# Altium PCB Yalynka.PcbDoc
Units mil, origin at the board's own origin, x right, y up, seen from the top; angles counter-clockwise.
Board outline 2470 x 1740 mil, 2 copper layers (Top Layer, Bottom Layer); 10 components, 8 nets, 22 pads, 2 vias.
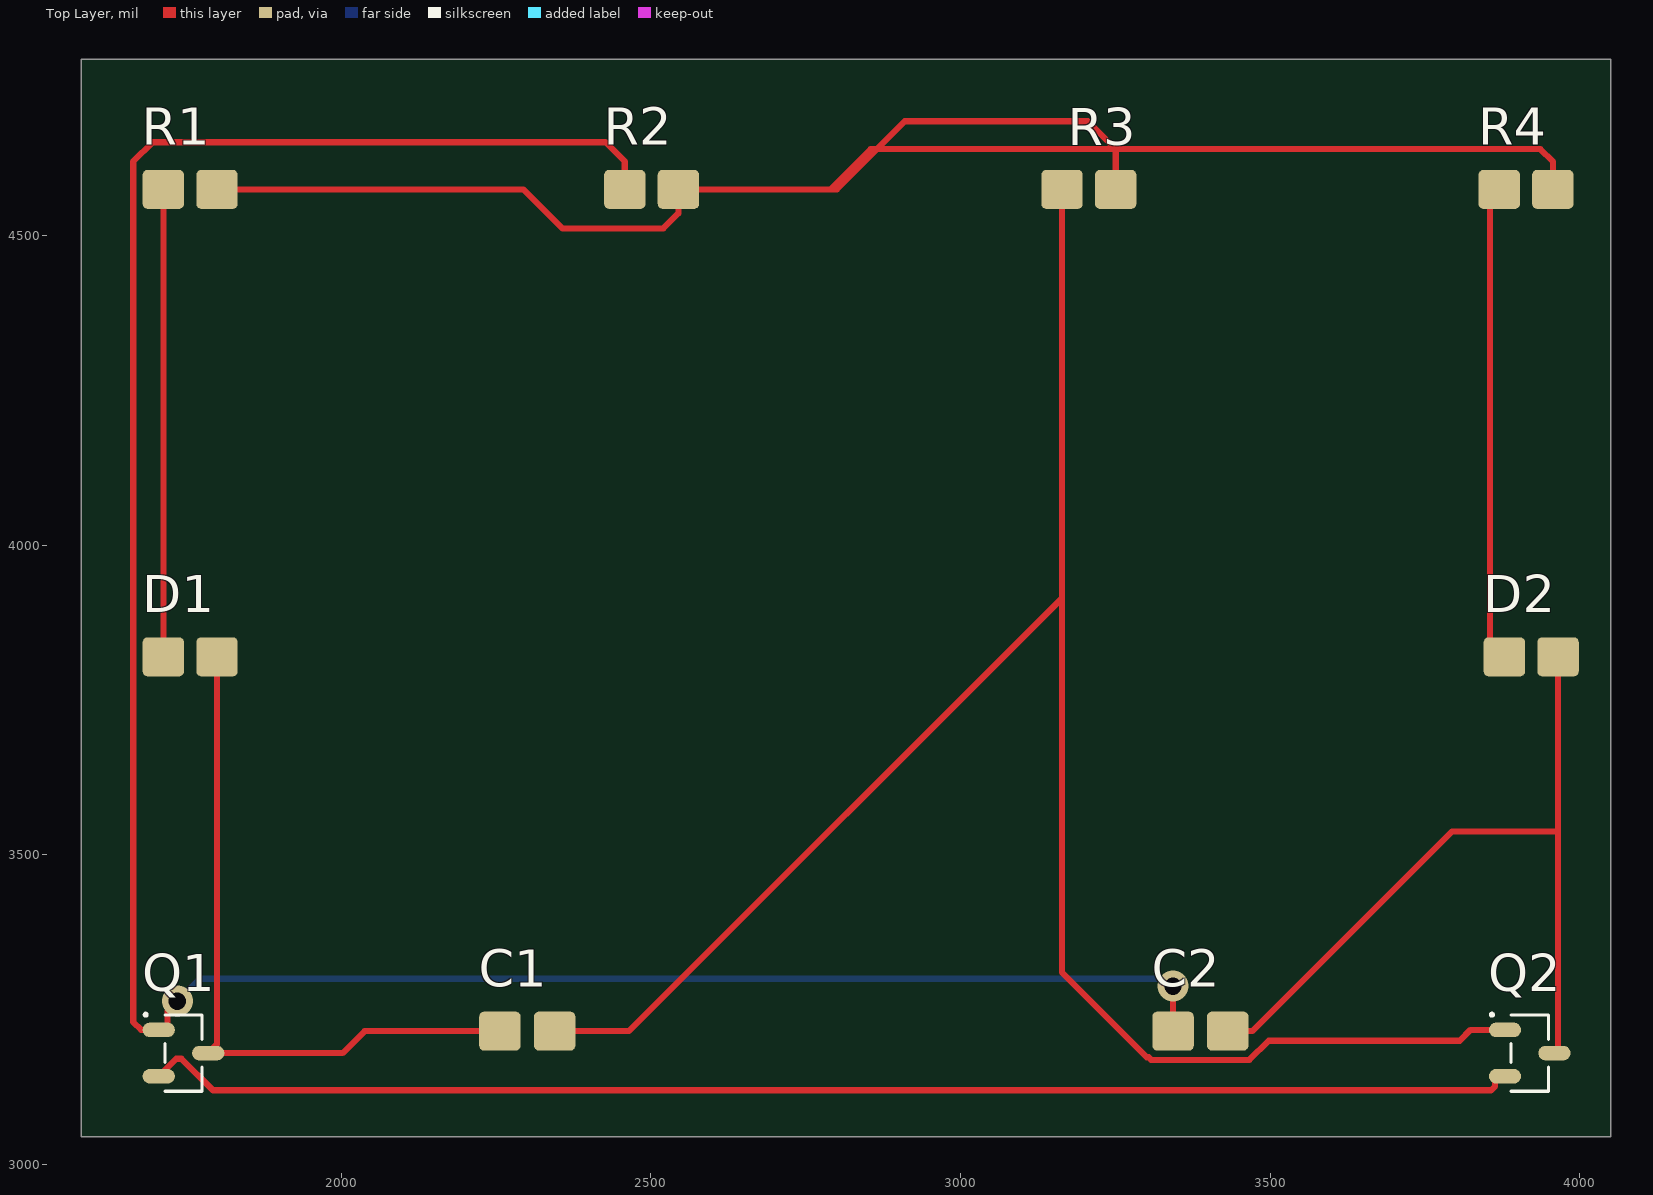
[diagram p0: Top Layer view]
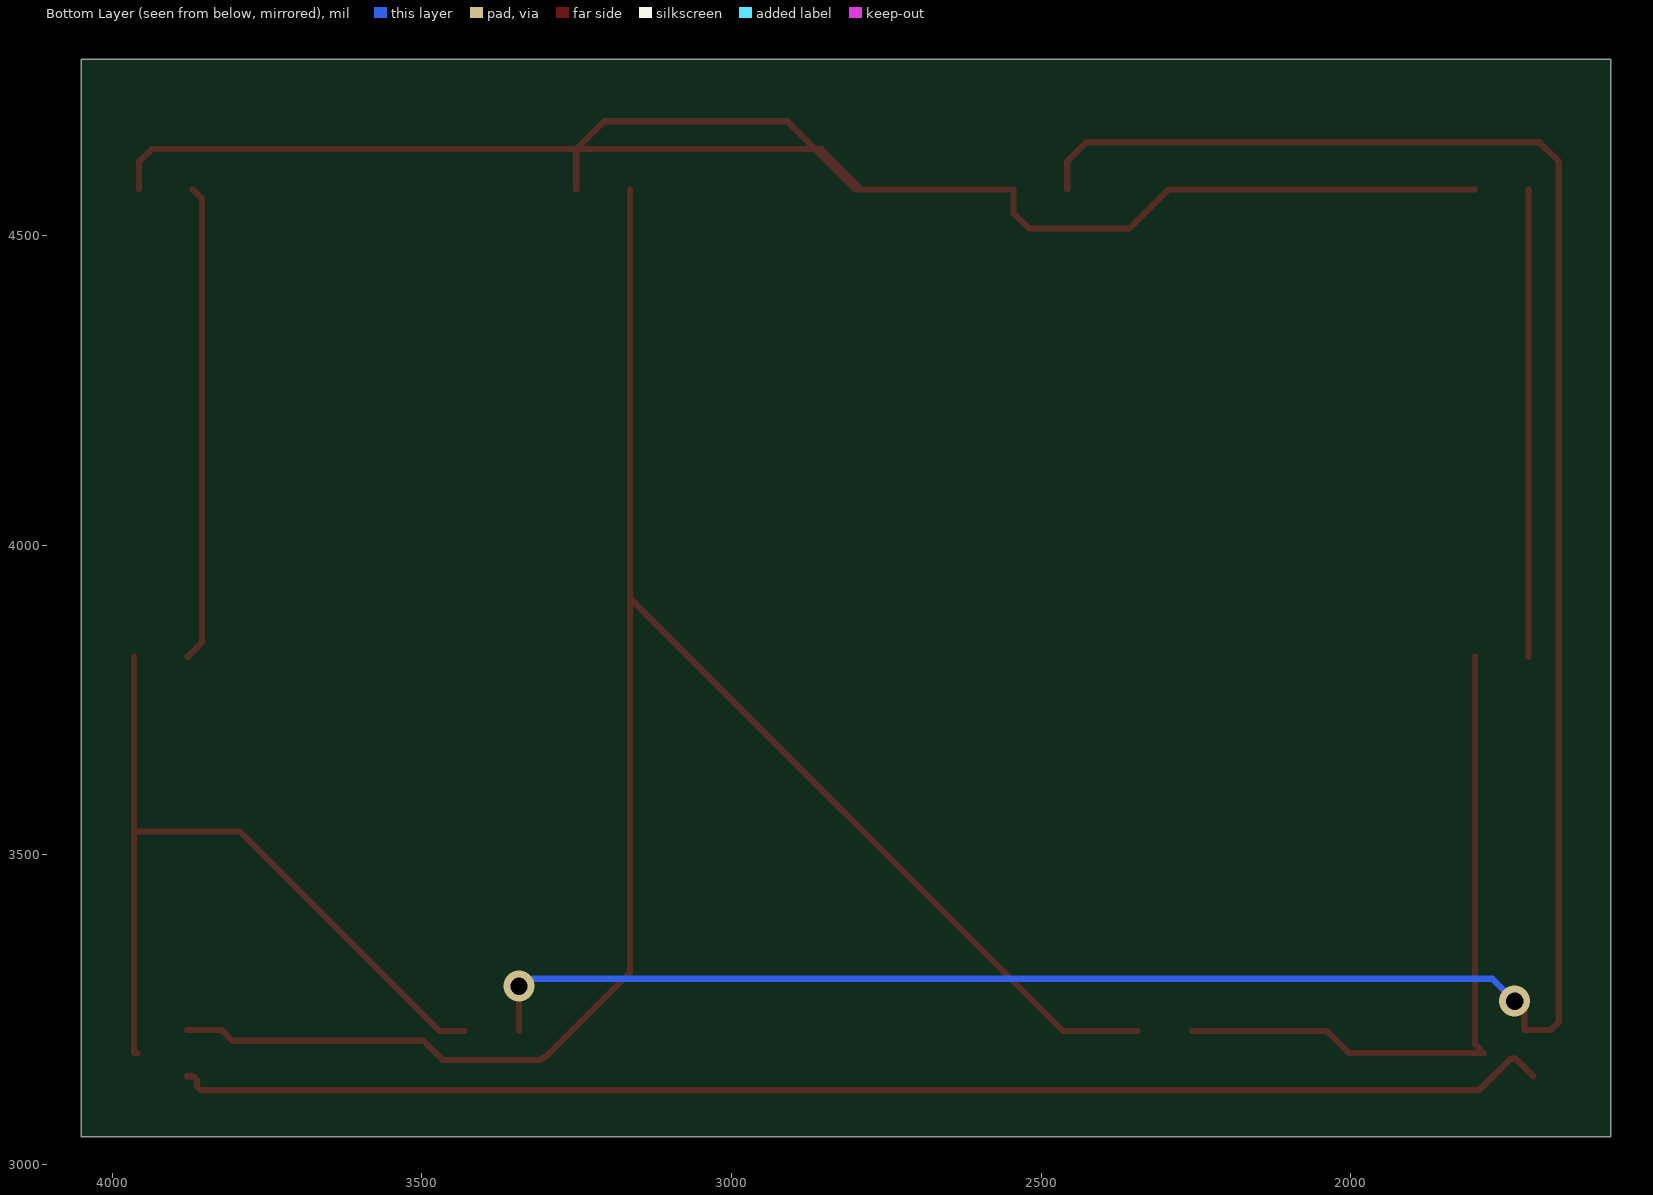
[diagram p1: Bottom Layer view, seen from below]
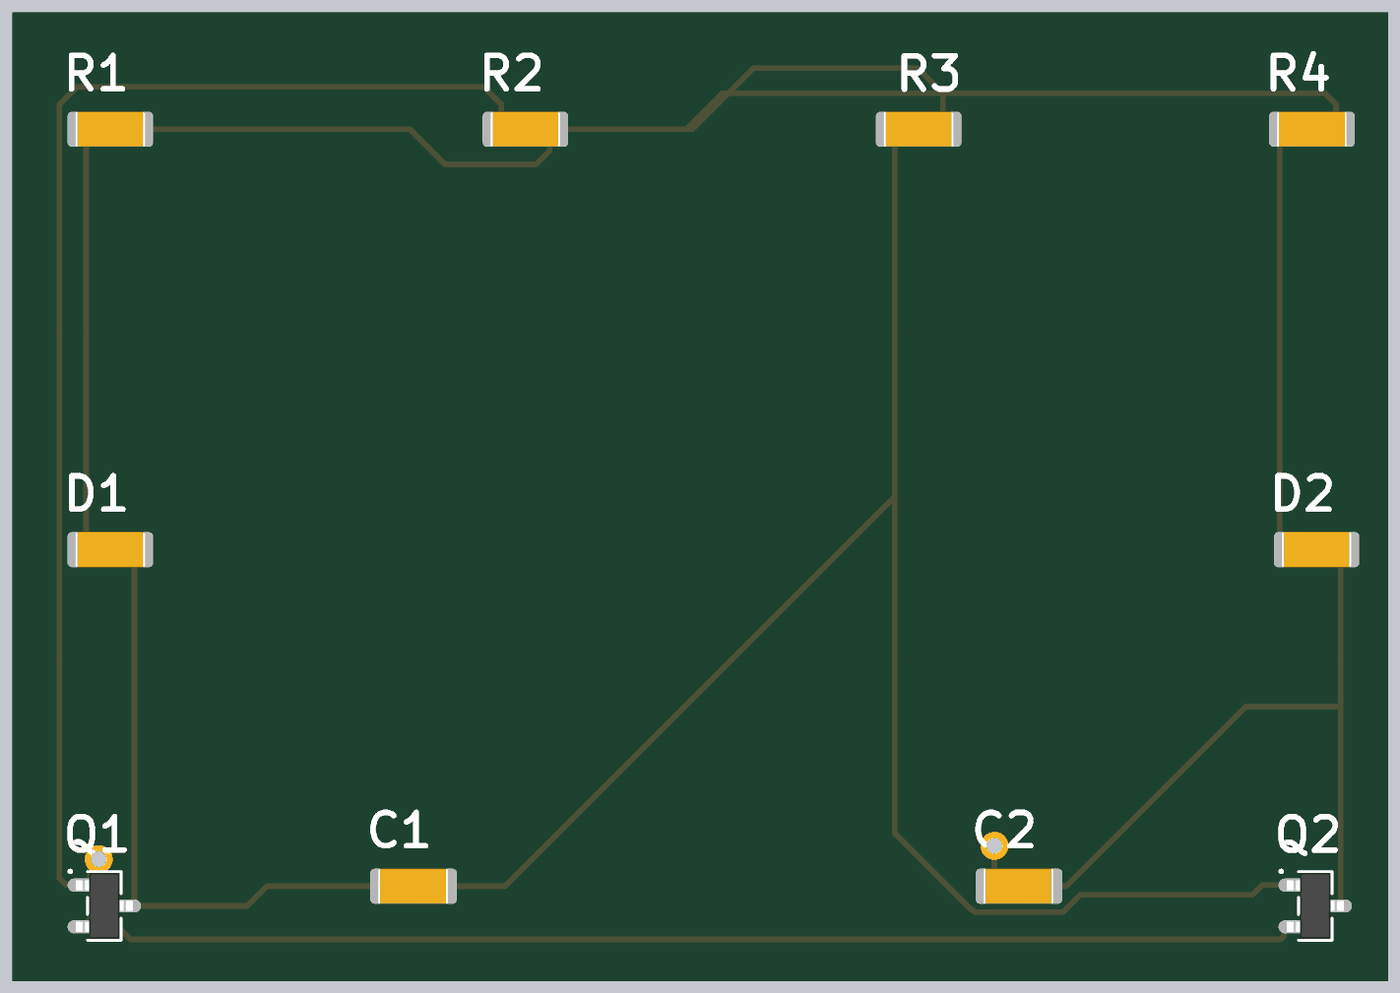
[diagram p2: 3D render of the assembled board from above, using the file's embedded part models]

## Layer stack, top to bottom
Top Solder: solder mask 0.4, Solder Resist, Dk 3.5
Top Layer: signal copper 1.4
Dielectric 1: dielectric 12.6, FR-4, Dk 4.8
Bottom Layer: signal copper 1.4
Bottom Solder: solder mask 0.4, Solder Resist, Dk 3.5

## Board outline
1580,3045 1580,4785 4050,4785 4050,3045

## Design rules (kind name [scope] priority, off if disabled: settings)
Clearance [All] p1: gap=10 ignorepadtopadclearanceinfootprint=FALSE
PolygonConnect [All] p1: connectstyle=Relief reliefconductorwidth=10 reliefentries=4 polygonreliefangle="90 Angle" airgapwidth=10
RoutingVias [All] p1: holewidth=28 width=50 viastyle="Through Hole" minholewidth=28 minwidth=50 maxholewidth=28 maxwidth=50
SolderMaskExpansion [All] p1: expansion=0 istentingtop=FALSE
SupplyNets "Schematic Supply Nets_1" [InNet('GND')] p1: voltage=0.000
SupplyNets "Schematic Supply Nets" [InNet('VCC')] p2: voltage=0.000
Width [All] p1: maxlimit=10 minlimit=10 preferedwidth=10
30 further rules are at their usual default settings.

## Components (designator, comment, footprint, x,y, rotation, side; value= is the part's Value field where it differs from the comment)
C1 "CAP" CAP_1206 2299.39,3215.43 r0 top
C2 "CAP" CAP_1206 3386.51,3215.43 r0 top
D1 "LED" LED_1206 1755.83,3820 r0 top
D2 "LED" LED_1206 3921.69,3820 r0 top
Q1 "NPN" SOT23 1745,3180 r0 top
Q2 "NPN" SOT23 3919.25,3180 r0 top
R1 "RES" RES_1206 1755.83,4575 r0 top
R2 "RES" RES_1206 2501.1,4575 r0 top
R3 "RES" RES_1206 3207.2,4575 r0 top
R4 "RES" RES_1206 3913.31,4575 r0 top

## Footprints (in the part's own frame and the unit in brackets; to place one, negate y for a bottom-side part, rotate by r counter-clockwise, add the part's x,y. Pads: shape width x height; smd on the part's side, far side on the other; paste and mask are expansions set on the pad)
CAP_1206 [mm]
  rrect25% 1.7x1.6 smd: 1(-1.1,0) 2(1.143,0)
  body extent -1.6,-0.8 1.6,0.8, height 1.2
LED_1206 [mm]
  rrect25% 1.7x1.6 smd: 1(-1.1,0) 2(1.1,0)
  body extent -1.6,-0.8 1.6,0.8, height 1.1
RES_1206 [mm] "Chip Capacitor, 2-Leads, Body 2,05x1,00mm, IPC Medium Density"
  rrect25% 1.7x1.6 smd: 1(-1.1,0) 2(1.1,0)
  body extent -1.6,-0.8 1.6,0.8, height 0.6
SOT23 [mm] "SOT23, 3-Leads, Body 2,90x2,45mm, Pitch 0,95mm, IPC Medium Density"
  oval 1.325x0.6 smd: 1(-1.012,0.95) 2(-1.012,-0.95) 3(1.012,0)
  silkscreen extent -1.61,-1.56 0.76,1.64, body extent -1.3,-1.5 1.3,1.5, height 1.1

## Via types
v1: diameter 50, hole 28, Top Layer to Bottom Layer, 2 vias

## Nets (pads, with @x,y where several pads share a name; then routed paths per layer and width w, separated by ;. In a path a pad name is that pad's centre, name@x,y a point inside that pad or via, vN(x,y) a via of type N, cw(c..) or ccw(c..) an arc to the next point about the centre after c; other vN are vias at no path point)
GND: Q1.2 Q2.2 | length 2222.2
  Top Layer w10: Q1.2 1733.46,3170.93 1741.75,3170.93 1792.67,3120 3856.79,3120 3863.29,3126.51 3863.29,3136.31 3869.59,3142.6 Q2.2
NetC1_1: C1.1 D1.2 Q1.3 | length 1131.8
  Top Layer w10: D1.2 1799.13,3194.27 Q1.3 2002,3180 2037.43,3215.43 C1.1
NetC1_2: C1.2 Q2.1 R3.1 | length 3168.2
  Top Layer w10: C1.2 2464.33,3215.43 3163.9,3915 ; R3.1 3163.9,3915 ; Q2.1 3823.6,3217.4 3806.2,3200 3497.64,3200 3466.58,3168.94 3308.14,3168.94 3303.89,3173.19 3300.81,3173.19 3163.9,3310.1 3163.9,3915
NetC2_1: C2.1 Q1.1 R2.1 | length 4068.6
  Top Layer w10: v1(1735,3264) 1719,3248 1719,3217.4 Q1.1 1676.6,3217.4 1664,3230 1664,4620 1695,4651 2426.8,4651 2457.8,4620 R2.1 ; C2.1 v1(3343.21,3288)
  Bottom Layer w10: v1(1735,3264) 1771,3300 3320.38,3300 3332.38,3288 v1(3343.21,3288)
NetC2_2: C2.2 D2.2 Q2.3 | length 1313
  Top Layer w10: C2.2 3471.43,3215.43 3794,3538 3965,3538 ; Q2.3 3965,3180 3965,3538 ; D2.2 3965,3538
NetD1_1: D1.1 R1.1 | length 755
  Top Layer w10: D1.1 R1.1
NetD2_1: D2.1 R4.1 | length 770.9
  Top Layer w10: R4.1 3855,4560 3855,3843.38 D2.1
VCC: R1.2 R2.2 R3.2 R4.2 | length 2902.2
  Top Layer w10: R1.2 2294,4575 2357,4512 2520,4512 2544.41,4536.41 R2.2 2790,4575 ; R3.2 3250.51,4640 ; R4.2 3956.61,4620 3936.61,4640 3250.51,4640 ; 2790,4575 2800,4575 2865,4640 ; 2790,4575 2855,4640 2865,4640 ; 2865,4640 3250.51,4640 ; 2865,4640 2910,4685 3205.51,4685 3250.51,4640

## Silkscreen, mask and mechanical layers (free items; w line width, h text height)
Mechanical 1:
  the board outline again, w10